# Altium PCB DTU_LiPo_Charger_v1.0.PcbDoc
Units mil, origin at the board's own origin, x right, y up, seen from the top; angles counter-clockwise.
Board outline 1110 x 1375 mil, 2 copper layers (Top Layer, Bottom Layer); 19 components, 14 nets, 63 pads, 60 vias.
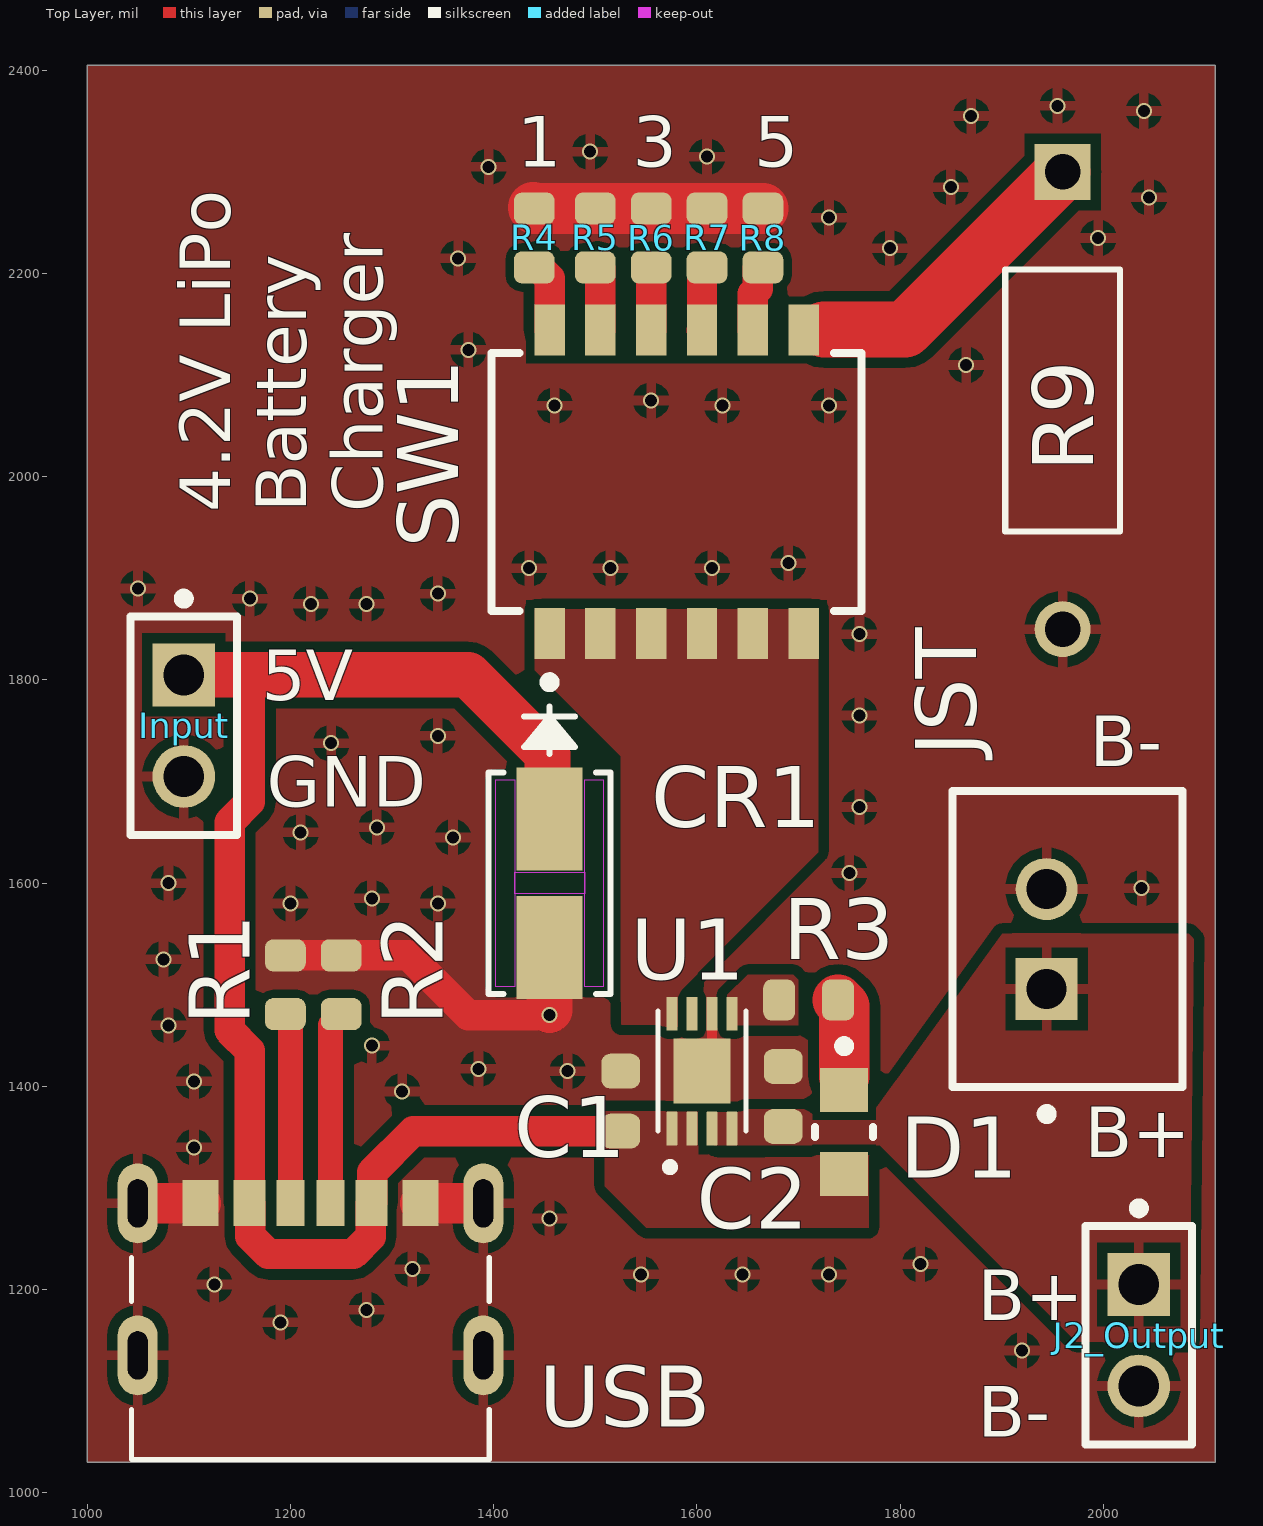
[diagram p0: Top Layer view]
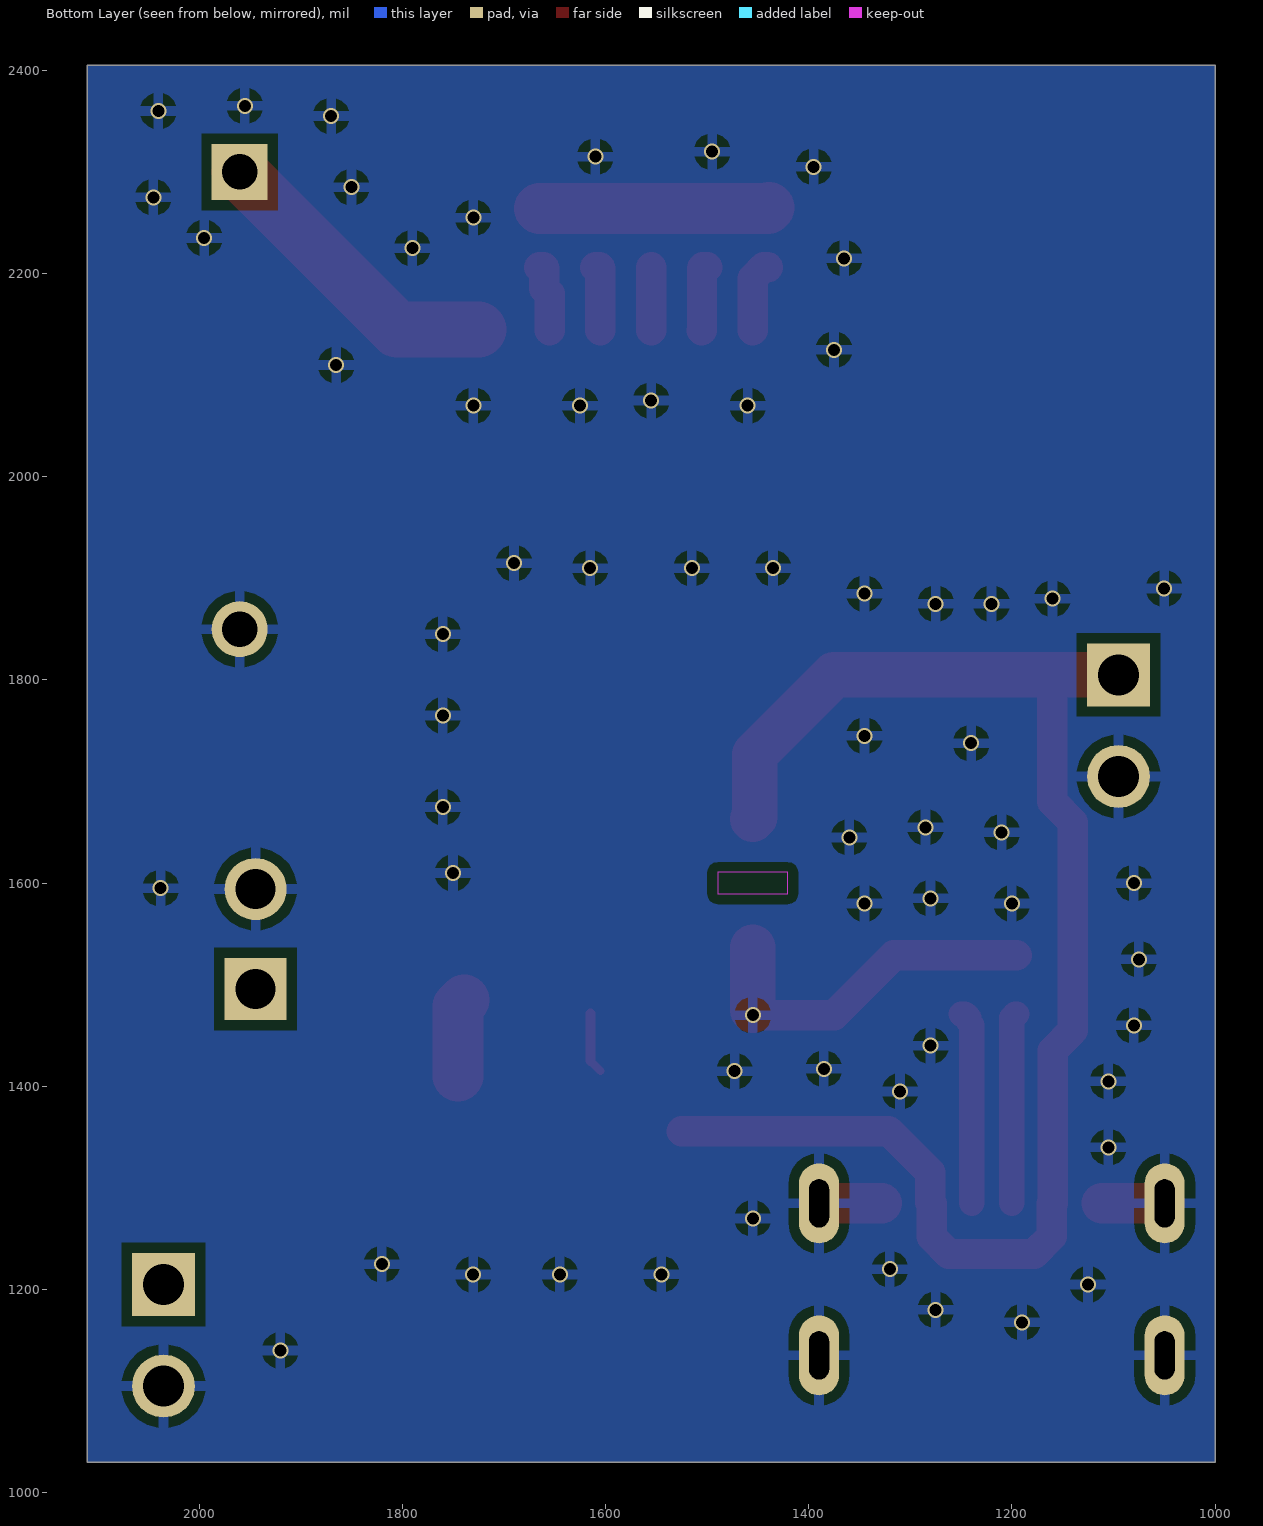
[diagram p1: Bottom Layer view, seen from below]
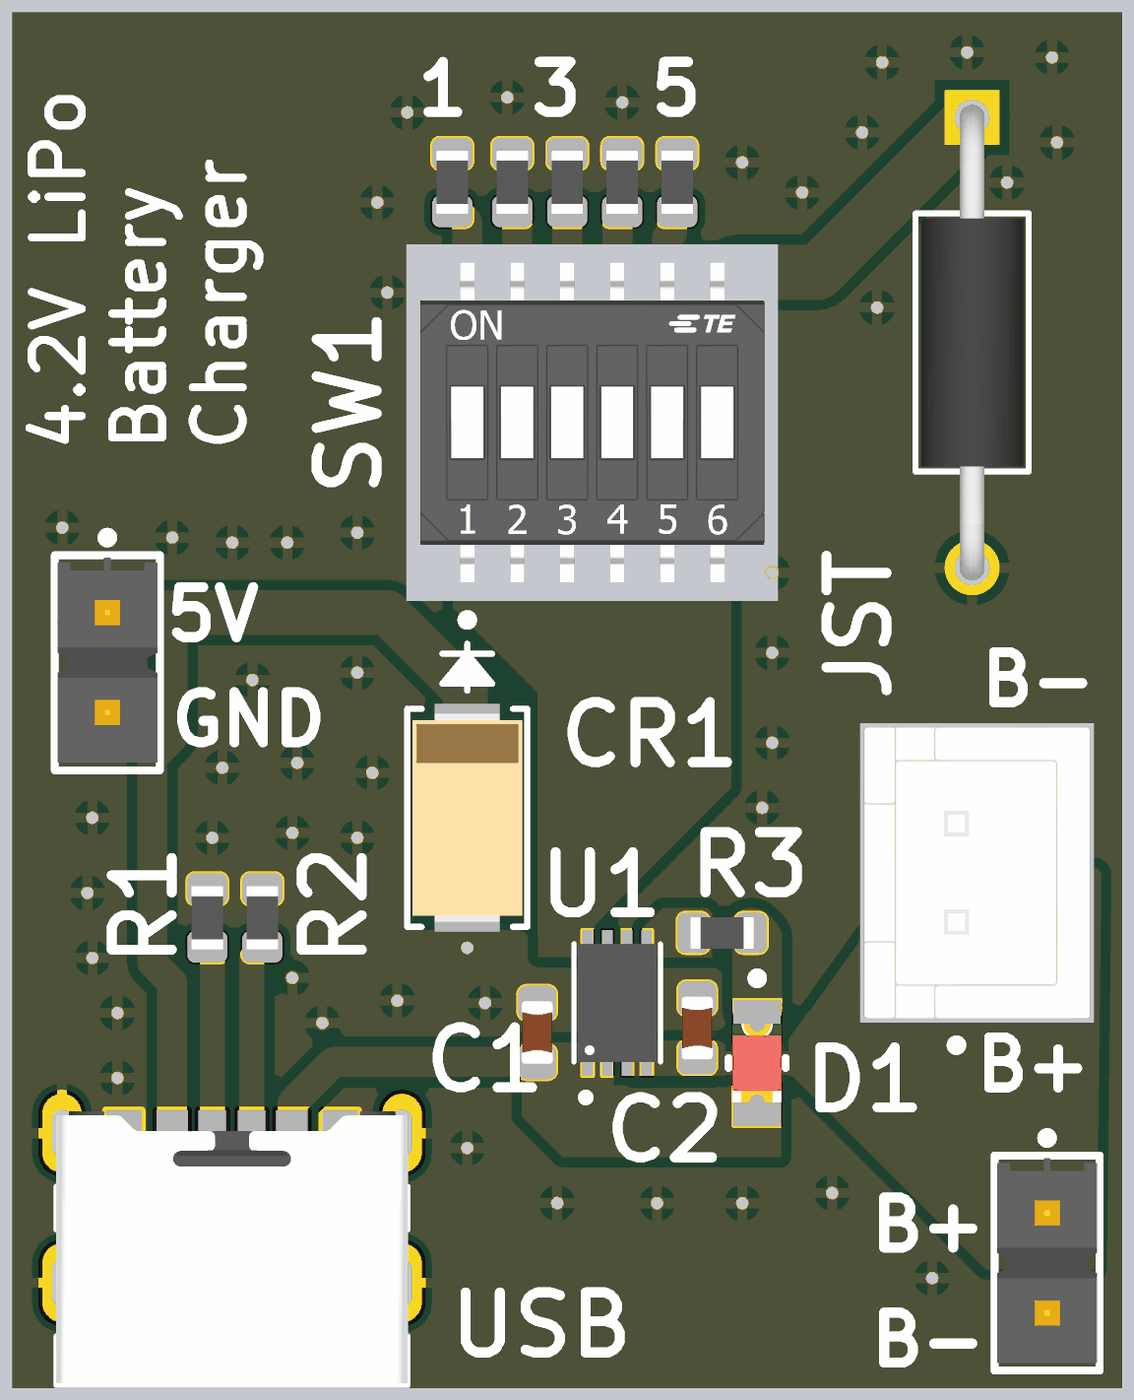
[diagram p2: 3D render of the assembled board from above, using the file's embedded part models]

## Layer stack, top to bottom
Top Solder: solder mask 0.4, Solder Resist, Dk 3.5
Top Layer: signal copper 1.4
Dielectric 1: dielectric 12.6, FR-4, Dk 4.8
Bottom Layer: signal copper 1.4
Bottom Solder: solder mask 0.4, Solder Resist, Dk 3.5

## Board outline
1000,1030 2110,1030 2110,2405 1000,2405

## Design rules (kind name [scope] priority, off if disabled: settings)
Clearance [All] p1: gap=10 ignorepadtopadclearanceinfootprint=FALSE except(1: SMDPad-Region THPad-Region; 7.87: Arc-SMDPad Track-SMDPad SMDPad-SMDPad SMDPad-Poly)
MinimumSolderMaskSliver [All] p1: minsoldermaskwidth=1.97
PolygonConnect [All] p1: thpad.connectstyle=Relief thpad.reliefconductorwidth=10 thpad.reliefentries=4 thpad.polygonreliefangle="90 Angle" thpad.airgapwidth=10 smdpad.connectstyle=Direct smdpad.reliefconductorwidth=10 smdpad.reliefentries=4 smdpad.polygonreliefangle="90 Angle" smdpad.airgapwidth=10 via.connectstyle=Direct via.reliefconductorwidth=10 via.reliefentries=4 via.polygonreliefangle="90 Angle" via.airgapwidth=10
RoutingVias [All] p1: holewidth=11.81 width=15.75 viastyle="Through Hole" minholewidth=11.81 minwidth=15.75 maxholewidth=11.81 maxwidth=15.75
SolderMaskExpansion [All] p1: expansion=4 istentingtop=FALSE
SupplyNets "Schematic Supply Nets_2" [InNet('+5')] p1: voltage=0.000
SupplyNets "Schematic Supply Nets" [InNet('GND')] p2: voltage=0.000
Width [All] p1: maxlimit=100 minlimit=7.87 preferedwidth=10
29 further rules are at their usual default settings.

## Classes and differential pairs
component class "Li-Ion Battery Charger": C1 C2 CR1 D1 R3 U1 U?
component class Connectivity: Input J2_Output JST R1 R2 USB
component class "Adjustable Current": R4 R5 R6 R7 R8 R9 SW1

## Components (designator, comment, footprint, x,y, rotation, side; value= is the part's Value field where it differs from the comment)
C1 "4u7" CAP_0603 1525,1385.47 r270 top
C2 "4u7" CAP_0603 1685,1390 r270 top
CR1 "SMAJ5.0A" SMASeries_LTF-M 1455,1600 r270 top
D1 "598-8110-107F" RED_LED_0805 1745,1355 r270 top
Input "SAMTEC-TMM-102-03-X-S" SAMTEC-TMM-102-03-X-S 1095,1755 r270 top
J2_Output "SAMTEC-TMM-102-03-X-S" SAMTEC-TMM-102-03-X-S 2035,1155 r270 top
JST "B2B-XH-A" JST_B2B-XH-A 1965,1545 r90 top (schematic designator J1_Output)
R1 "5k1" RES_0603 1195,1500 r270 top
R2 "5k1" RES_0603 1250,1500 r270 top
R3 "R0603" RES_0603 1710,1485 r0 top
R4 "10k" RES_0603 1440,2235 r90 top
R5 "5k1" RES_0603 1500,2235 r90 top
R6 "3k3" RES_0603 1555,2235 r90 top
R7 "2k4" RES_0603 1610,2235 r90 top
R8 "2k" RES_0603 1665,2235 r90 top
R9 "DIN0402 THT Resistor" "DIN0207 THT Resistor" 1960,2300 r270 top
SW1 "A6H-6101" SW_A6H-6101_OMR 1580,1995 r0 top
U1 "MCP73831-2ACI/MC" SON50P200X300X100-9N 1605,1415 r90 top
USB "UJC-HP-3-SMT-TR" CUI_UJC-HP-3-SMT-TR 1219.68,1284.8 r0 top (schematic designator J_USB_C)

## Footprints (in the part's own frame and the unit in brackets; to place one, negate y for a bottom-side part, rotate by r counter-clockwise, add the part's x,y. Pads: shape width x height; smd on the part's side, far side on the other; paste and mask are expansions set on the pad)
CAP_0603 [mm]
  rrect51% 0.87x0.97 smd mask+0.05: 1(-0.75,0) 2(0.75,0)
  body extent -0.8,-0.4 0.8,0.4, height 0.8
CUI_UJC-HP-3-SMT-TR [mm]
  rect 0.7x1.15 smd: A5(-0.5,0.005) B5(0.5,0.005)
  rect 0.8x1.15 smd: A9(1.52,0.005) B9(-1.52,0.005)
  rect 0.9x1.15 smd: A12(2.75,0.005) B12(-2.75,0.005)
  oval 1x2 hole 0.5 slot 1.2 at 90 deg: S1(-4.32,0) S2(4.32,0) S3(-4.32,-3.8) S4(4.32,-3.8)
  silkscreen extent -4.47,-6.4 4.47,-1.35, body extent -4.47,-6.35 4.47,0.55, height 1.93
"DIN0207 THT Resistor" [mil]
  rect 55x55 hole 35 paste-99999 mask+0: 1(0,0)
  round 55 hole 35 paste-99999 mask+0: 2(450,0)
  silkscreen extent 96,-56 354,57, body extent -12,-51 462,51, height 103
JST_B2B-XH-A [mm]
  rect 1.55x1.55 hole 1 paste-2539.97 mask+0: 1(-1.25,0.525)
  round 1.55 hole 1 paste-2539.97 mask+0: 2(1.25,0.525)
  silkscreen extent -4.5,-2.88 3.7,2.88, body extent -3.8,-2.98 3.8,2.98, height 0.25
RED_LED_0805 [mm]
  rect 1.1x1.2 smd paste+0 mask+0.05: 1(-1.05,0) 2(1.05,0)
  silkscreen extent -2.27,-0.72 0.13,0.72, body extent -1.7,-0.82 1.7,0.82, height 0.25
RES_0603 [mm]
  rrect50% 0.8x1.02 smd mask+0.05: 1(-0.735,0) 2(0.735,0)
  body extent -0.8,-0.4 0.8,0.4, height 0.55
SAMTEC-TMM-102-03-X-S [mm]
  rect 1.57x1.57 hole 1.02 paste-2539.97 mask+0: 1(-1.27,0)
  round 1.57 hole 1.02 paste-2539.97 mask+0: 2(1.27,0)
  silkscreen extent -3.3,-1.34 2.73,1.34, body extent -2.83,-1.44 2.83,1.44, height 0.25
SMASeries_LTF-M [mil]
  rect 101.34x65 smd paste+0 mask+0: 1(-63.17,0) 2(63.17,0)
  Top Layer keep-out region: -10.5,-34.5 -10.5,34.5 10.5,34.5 10.5,-34.5
  Top Layer keep-out region: -102,34.5 -102,53 102,53 102,34.5
  Top Layer keep-out region: -102,-53 -102,-34.5 102,-34.5 102,-53
  Keep-Out Layer region: -10.5,-34.5 -10.5,34.5 10.5,34.5 10.5,-34.5
  silkscreen extent -174,-60 109,60, body extent -104,-55 104,55, height 92
SON50P200X300X100-9N [mm]
  rrect7% 0.84x0.27 smd mask+0.05: 1(-1.435,0.75) 2(-1.435,0.25) 3(-1.435,-0.25) 4(-1.435,-0.75) 5(1.435,-0.75) 6(1.435,-0.25) 7(1.435,0.25) 8(1.435,0.75)
  rect 1.625x1.425 smd paste-2 mask+0.05: 9(0,0)
  silkscreen extent -2.5,-1.1 1.5,1.1, body extent -1.5,-1 1.5,1, height 1
SW_A6H-6101_OMR [mm]
  rect 0.76x1.27 smd paste+0 mask+0: 1(-3.175,-3.795) 2(-1.905,-3.795) 3(-0.635,-3.795) 4(0.635,-3.795) 5(1.905,-3.795) 6(3.175,-3.795) 7(3.175,3.795) 8(1.905,3.795) 9(0.635,3.795) 10(-0.635,3.795) 11(-1.905,3.795) 12(-3.175,3.795)
  silkscreen extent -4.62,-5.13 4.62,3.22, body extent -4.72,-4.53 4.72,4.53, height 0.25

## Part data
C1 C2: library part CAP_0603, "Capacitor SMD 0603 / Ceramic"
CR1: "ESD Protection Diode", Manufacturer_Name="Littelfuse Inc", Copyright="Copyright (C) 2025 Ultra Librarian. All rights reserved.", Manufacturer_Part_Number=SMAJ5.0A
D1: library part RED_LED_0805, "598-8110-107F 598-8110-107F, Dialight, SMD LED 0805 Package, Red Single color SOLD IN INCREMENTS OF 4000. (REEL)", Case Code (Imperial)=0805, Case Code (Metric)=2012, Color=Red, Forward Current=20mA, Forward Voltage=2.2V, Max Junction Temperature (Tj)=105°C, Max Operating Temperature=85°C, Min Operating Temperature=-30°C, Power Dissipation=60mW, Reverse Voltage=5V, Case/Package=0805, Depth=1.25mm, Dominant Wavelength=635nm, Height=800µm, Illumination Color=Red, Lead Free="Lead Free", Length=2mm, Lens Style=Clear, Luminous Intensity=40mcd, Mount="Surface Mount", NexarPartId=868569, Number of Elements=1, Number of LEDs=1, Number of Pins=2, Radiation Hardening=No, REACH SVHC="No SVHC", RoHS=Compliant, Schedule B="8541402000, 8541402000|8541402000, 8541402000|8541402000|8541402000, 8541402000|8541402000|8541402000|8541402000", Test Current=20mA, Viewing Angle=140°, Wavelength=635nm, Width=1.25mm
Input J2_Output JST USB: Package=None, Availability=Unavailable, Price=None
  Input J2_Output: MP=SAMTEC-TMM-102-03-X-S
  JST: MF="{'manufacturer': u'JST Sales America Inc.'}", MP=B2B-XH-A
  USB: MP=UJC-HP-3-SMT-TR
R1 R2 R3 R4 R5 R6 R7 R8: library part RES_0603, "Resistor SMD 0603"
R9: "Description", Manufacturer_Name="Stackpole International", Manufacturer_Part_Number=CF14JT1K00, Copyright="Copyright (C) 2025 Ultra Librarian. All rights reserved."
SW1: "Description", Manufacturer_Name=Omron, Copyright="Copyright (C) 2025 Ultra Librarian. All rights reserved.", Manufacturer_Part_Number=A6H-6101, RefDes=RefDes, Type=Type
U1: "Charge Controller Li-Ion/Li-Pol 15mA to 500mA 4.2V 8-Pin DFN EP", Package="VFDFN-8 Microchip", Check_prices=https://www.snapeda.com/parts/MCP73831-2ACI/MC/Microchip/view-part/?ref=eda, MF=Microchip, MP=MCP73831-2ACI/MC, SnapEDA_Link=https://www.snapeda.com/parts/MCP73831-2ACI/MC/Microchip/view-part/?ref=snap

## Via types
v1: diameter 15.75, hole 11.81, Top Layer to Bottom Layer, tented both sides, 60 vias

## Nets (pads, with @x,y where several pads share a name; then routed paths per layer and width w, separated by ;. In a path a pad name is that pad's centre, name@x,y a point inside that pad or via, vN(x,y) a via of type N, cw(c..) or ccw(c..) an arc to the next point about the centre after c; other vN are vias at no path point)
+5: C1.2 CR1.1 D1.2 Input.1 U1.1 U1.2 USB.A9 USB.B9 | length 1482.3
  Top Layer w30: 1160,1805 1160,1680 1140,1660 1140,1455 1159.84,1435.16 USB.B9 1160.59,1284.25 1160.59,1252.57 1178.16,1235 1261.95,1235 1278.78,1251.83 1278.78,1284.25 USB.A9 1280.28,1285.75 1280.28,1315.28 1320.94,1355.94 C1.2
  Top Layer w45: Input.1 1160,1805 1375,1805 1453,1727 1453,1665.17 CR1.1
GND: C1.1 C2.1 CR1.2 Input.2 J2_Output.2 JST.2 R1.1 R2.1 R4.2 R5.2 R6.2 R7.2 R8.2 R9.2 U1.6 U1.9 USB.A12 USB.B12 USB.S1 USB.S2 USB.S3 USB.S4 | length 757
  Top Layer w7.87: U1.9 U1.9@1614.84,1424.84
  Top Layer w10: U1.9@1614.84,1424.84 U1.6
  Top Layer w30: R1.1 R2.1 1316.06,1528.94 1375,1470 v1(1455,1470)
  Top Layer w40: USB.S1 1049.7,1284.9 1111.32,1284.9 USB.B12 ; USB.A12 1328.05,1284.9 1389.67,1284.9 USB.S2
  Top Layer w45: v1@1454.96,1475.1 CR1.2
  Top Layer w50: R4.2@1438.94,2265 R4.2 R5.2 R6.2 R7.2 R8.2
  other v1: 1920,1140 1190,1167.72 1275,1180 1125,1205 1545,1215 1644.85,1214.88 1730.12,1214.85 1320,1220 1820,1225 1455,1270 1105,1340 1310,1395 1105,1405 1472.88,1414.88 1385,1417.28 1280,1440 1080,1460 1075,1525 1200,1580 1345,1580 1280,1585 2037.72,1595 1080,1600 1750,1610 1360,1645 1210,1650 1285,1655 1760,1675 1240,1737.72 1345,1745 1760,1765 1760,1845 1220,1875 1275,1875 1160,1880 1345,1885 1050,1890 1435,1910 1515,1910 1615,1910 1690,1915 1460,2070 1625,2070 1730,2070 1555,2075 1865,2110 1375,2125 1365,2215 1790,2225 1995,2235 1730,2255 2045,2275 1850,2285 1395,2305 1610,2315 1495,2320 1870,2355 2040,2360 1955,2365
NetD1_1: D1.1 R3.2 | length 77.5
  Top Layer w50: R3.2 1745,1478.94 D1.1@1745,1410
NetR1_2: R1.2 USB.A5 | length 189.2
  Top Layer w25: R1.2 1196.75,1471.06 1200,1467.81 USB.A5
NetR2_2: R2.2 USB.B5 | length 193
  Top Layer w25: USB.B5 1239.37,1460.43 1242.42,1463.48 1242.42,1467.81 1245.67,1471.06 R2.2
NetR4_1: R4.1 SW1.12 | length 70.4
  Top Layer w30: R4.1 1444.33,2206.06 1454.96,2195.43 SW1.12 SW1.12
NetR5_1: R5.1 SW1.11 | length 66.2
  Top Layer w30: R5.1 1504.21,2206.06 1504.96,2205.31 SW1.11 SW1.11
NetR6_1: R6.1 SW1.10 | length 61.7
  Top Layer w30: SW1.10 R6.1
NetR7_1: R7.1 SW1.9 | length 66.2
  Top Layer w30: SW1.9 SW1.9 1605.04,2205.31 1605.79,2206.06 R7.1
NetR8_1: R8.1 SW1.8 | length 68.3
  Top Layer w30: SW1.8 SW1.8 1655.04,2180.04 1660,2185 1660,2205.31 1660.75,2206.06 R8.1
NetR9_1: R9.1 SW1.7 | length 299.2
  Top Layer w55: 1725,2145 1805,2145 R9.1
PROG: SW1.1 SW1.2 SW1.3 SW1.4 SW1.5 SW1.6 U1.8
STAT: R3.1 U1.5
VBAT: C2.2 J2_Output.1 JST.1 U1.3 U1.4
pads on no net: U1.7

## Polygon pours and split planes (outlines as drawn)
GND on Top Layer "GND_L01_P007" (solid, pour order 7): 1000,1030 2110,1030 2110,2405 1000,2405
GND on Top Layer "NONET_L-01_P-001" (solid, pour order 3): 1705,1450 1705,1385 1696.3,1376.3 1435,1376.3 1435,1450
PROG on Top Layer "NONET_L-01_P-001" (solid, pour order 5): 1440,1870 1720,1870 1720,1630 1585,1495 1585,1455 1525,1455 1525,1725 1440,1810
STAT on Top Layer "NONET_L-01_P-001" (solid, pour order 4): 1629.26,1455.43 1629.69,1455 1700,1455 1700,1505 1695,1510 1650,1510 1630,1490
VBAT on Top Layer "NONET_L-01_P-001" (solid, pour order 2): 1610,1341.94 1780,1341.94 1973.96,1147.98 2085.17,1147.98 2090,1550.85 1900,1550.85 1776,1378.26 1708.01,1377.97 1610,1378.26
+5 on Top Layer "NONET_L-01_P-001" (solid, pour order 1): 1508.68,1376.3 1601.35,1376.3 1601.35,1332.86 1769.73,1335 1769.73,1260 1601.35,1260 1550,1260 1508.68,1301.32
GND on Bottom Layer "GND_L02_P008" (solid, pour order 8): 1000,1030 2110,1030 2110,2405 1000,2405

## Silkscreen, mask and mechanical layers (free items; w line width, h text height)
Top Overlay:
  text "1" at 1423.34,2305 h50
  text "3" at 1536.68,2305 h50
  text "5" at 1656.68,2305 h50
  text "4.2V LiPo / Battery / Charger" at 1290.63,1965 h50 r90
  text "5V" at 1171.69,1780 h50
  text "B-" at 1986.69,1715 h50
  text "GND" at 1176.71,1675 h50
  text "B+" at 1981.69,1330 h50
  text "B+" at 1876.69,1170 h50
  text "B-" at 1876.69,1055 h50